# Altium PCB Zotino-DIOT.PCBDOC (part 7 of 11)
Units mil, origin at the board's own origin, x right, y up, seen from the top; angles counter-clockwise.
Board outline 8771.61 x 3949.04 mil, 4 copper layers (TopLayer, Internal Plane 2, Signal Layer 1, BottomLayer), stack 61.54 mil thick; 915 components, 534 nets, 3073 pads, 1180 vias.
Unrouted connection lines stored in the file: 36.
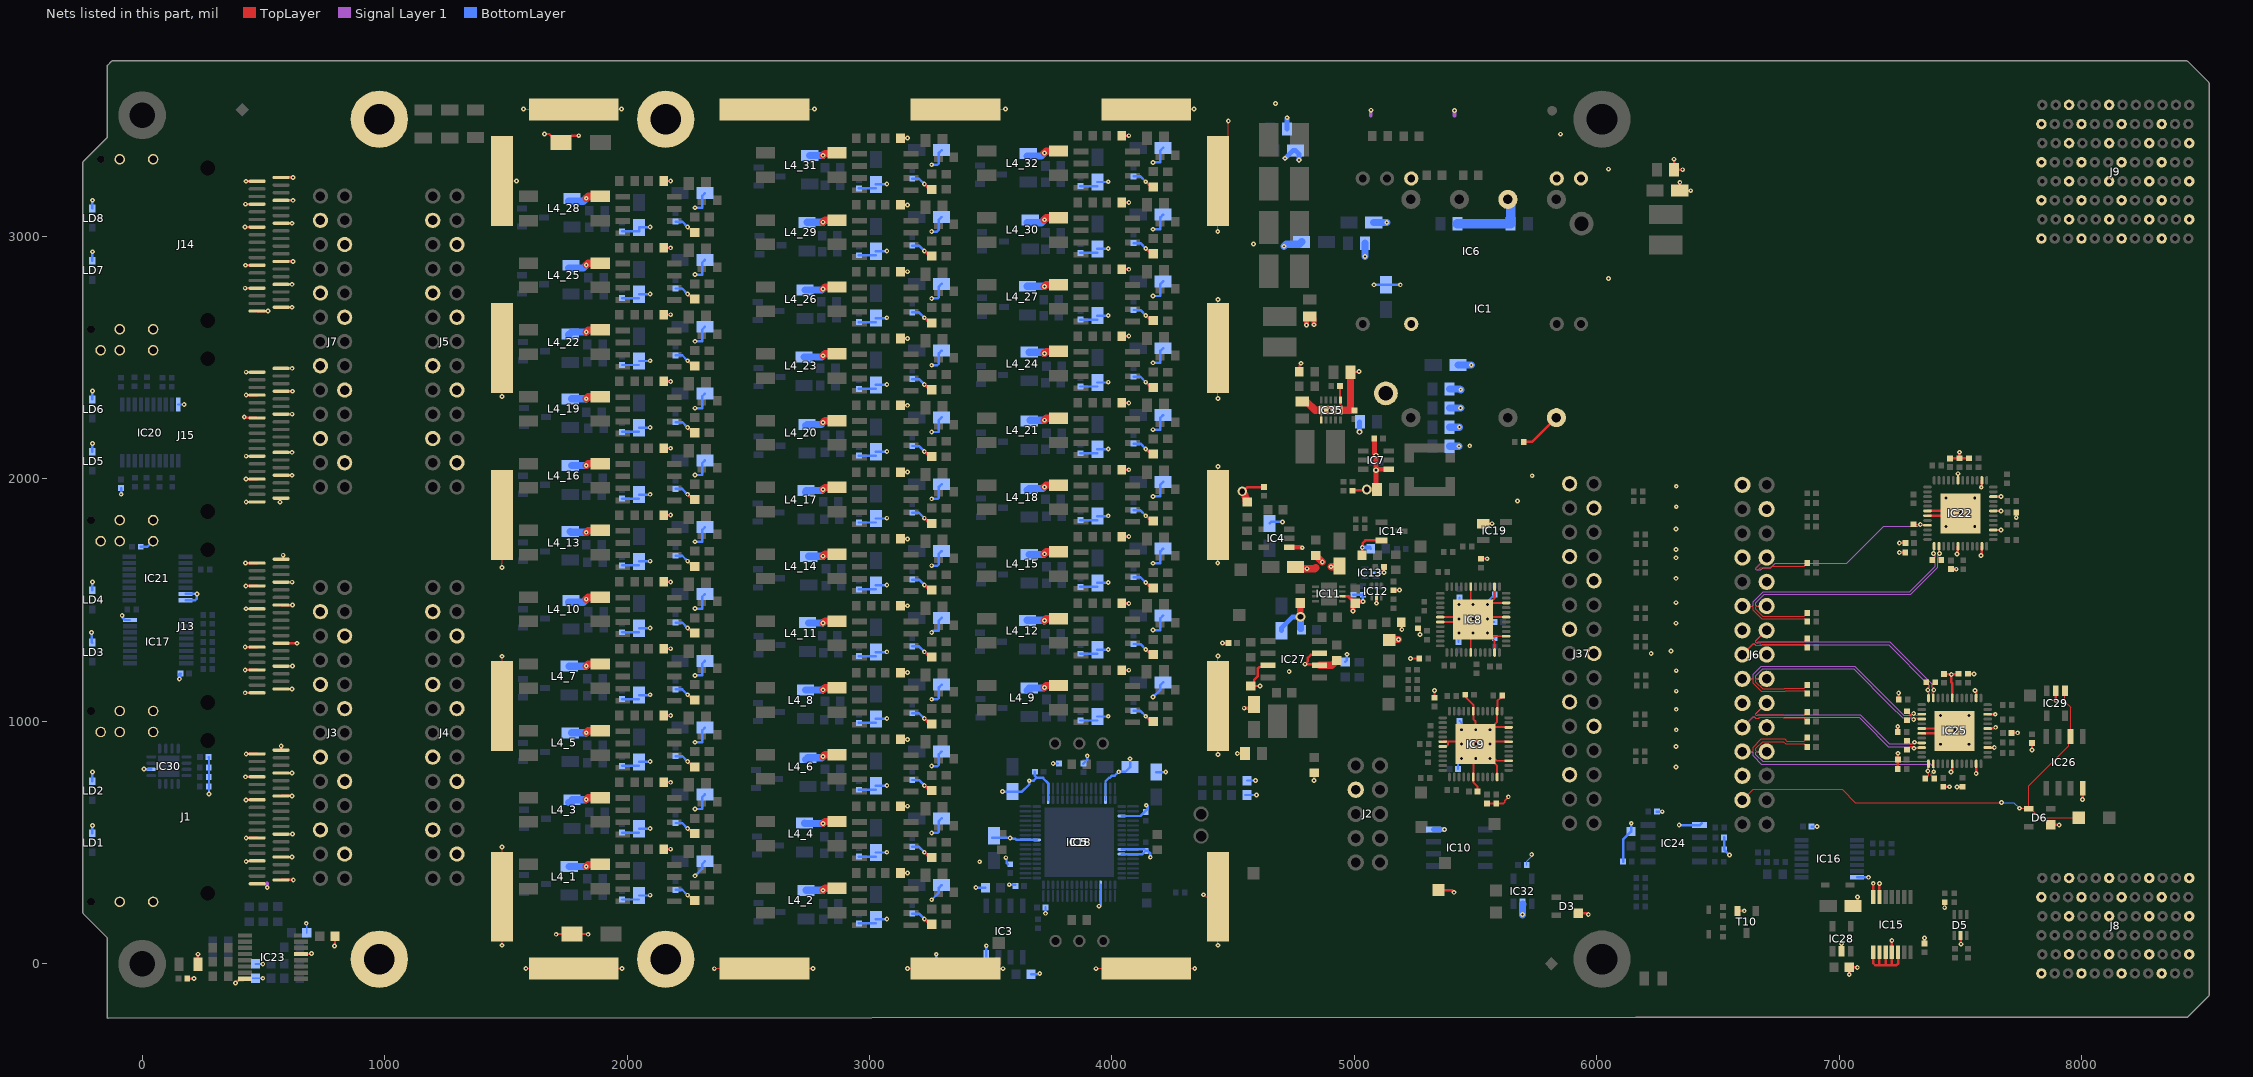
[diagram p8: the nets of this part, all layers, seen from the top]

## Via types
v1: diameter 19.68, hole 7.87, TopLayer to BottomLayer, tented both sides, 1050 vias
v2: diameter 23.62, hole 11.81, TopLayer to BottomLayer, tented both sides, 56 vias
v3: diameter 23.62, hole 11.81, TopLayer to BottomLayer, 28 vias
v4: diameter 39.37, hole 23.62, TopLayer to BottomLayer, tented both sides, 28 vias
v5: diameter 39.37, hole 19.68, TopLayer to BottomLayer, tented both sides, 7 vias
v6: diameter 19.68, hole 7.87, TopLayer to BottomLayer, tented bottom, 7 vias
v7: diameter 19.68, hole 7.87, TopLayer to BottomLayer, 4 vias

## Nets (pads, with @x,y where several pads share a name; then routed paths per layer and width w, separated by ;. In a path a pad name is that pad's centre, name@x,y a point inside that pad or via, vN(x,y) a via of type N, cw(c..) or ccw(c..) an arc to the next point about the centre after c; other vN are vias at no path point) (continued)
EEM1_LVDS2_P: IC22.9 J6.8 R106.1 R138.2 | length 1173.8
  TopLayer w5: J6.8@6700.79,1675.59 6656.75,1631.55 6656.75,1627.41 6659.68,1624.48 6663.82,1624.48 6673.97,1634.63 6717.76,1634.63 6722.49,1639.36 6855.48,1639.36 6858.41,1642.29 6858.41,1644.63 R138.2@6867.32,1653.54 ; R106.1@7307.09,1813.78 7308.38,1812.49 v1(7334.68,1812.49) ; v1@7334.65,1811.56 7335.9,1810.31 7362.92,1810.31 IC22.9@7364.17,1809.06
  Signal Layer 1 w5: J6.8@6700.79,1675.59 6656.75,1631.55 6656.75,1627.41 6659.68,1624.48 6676.19,1624.48 6686.33,1634.63 6717.76,1634.63 6735.96,1652.83 7030.78,1652.83 7183.61,1805.66 7324.41,1805.66 7331.24,1812.49 v1(7334.68,1812.49)
EEM1_LVDS3_N: IC22.14 J6.12 R109.2 R152.2 | length 1280.2
  TopLayer w5: J6.12@6700.79,1475.59 6659.22,1475.59 6656.29,1472.66 6656.29,1462.16 6684.08,1434.37 6856.37,1434.37 6867.8,1445.8 R152.2@6867.8,1446.59 ; IC22.14@7411.42,1722.44 7412.67,1721.19 7412.67,1694.16 7413.92,1692.91 7413.92,1691.9 7407.07,1685.06 7407.07,1675.57 7407.59,1675.06 7411.16,1675.06 7420.08,1666.14 R109.2@7420.08,1665.35
  Signal Layer 1 w5: J6.12@6700.79,1475.59 6659.22,1475.59 6656.29,1478.52 6656.29,1489.02 6690.89,1523.63 7295.09,1523.63 7407.07,1635.61 7407.07,1681.82 7413.92,1688.66 v1(7413.92,1692.09)
EEM1_LVDS3_P: IC22.13 J6.11 R109.1 R139.2 | length 1299.3
  TopLayer w5: J6.11@6600.79,1475.59 6642.36,1475.59 6645.29,1472.66 6645.29,1457.6 6679.52,1423.37 6856.37,1423.37 6867.8,1411.94 R139.2@6867.8,1411.15 ; R109.1@7383.07,1665.35 7383.07,1666.14 7391.99,1675.06 7395.56,1675.06 7396.07,1675.57 7396.07,1685.06 7389.23,1691.9 v1(7389.23,1692.91) 7390.48,1694.16 7390.48,1721.19 IC22.13@7391.73,1722.44
  Signal Layer 1 w5: J6.11@6600.79,1475.59 6642.36,1475.59 6645.29,1478.52 6645.29,1493.58 6686.33,1534.63 7290.53,1534.63 7396.07,1640.17 7396.07,1682.64 7389.23,1689.48 v1(7389.23,1692.91)
EEM1_LVDS4_N: IC25.48 J6.15 R124.2 R154.2 | length 1258.7
  TopLayer w5: J6.15@6600.79,1275.59 6644.83,1319.63 6648.97,1319.63 6655.12,1313.48 6680.74,1313.48 6685.35,1318.09 6855.95,1318.09 6858.88,1315.16 6858.88,1313.77 R154.2@6867.8,1304.85 ; R124.2@7359.45,1161.42 7359.45,1160.63 7368.37,1151.71 7369.52,1151.71 7372.45,1148.78 7372.45,1140.19 7365.61,1133.35 v1(7365.61,1129.92) 7365.61,1128.52 7372.45,1121.67 7372.45,1112.58 7368.11,1108.24 IC25.48@7368.11,1096.46
  Signal Layer 1 w5: J6.15@6600.79,1275.59 6644.83,1319.63 6648.97,1319.63 6655.12,1313.48 6668.38,1313.48 6671.45,1316.56 7203.5,1316.56 7372.45,1147.6 7372.45,1140.19 7365.61,1133.35 v1(7365.61,1129.92)
EEM1_LVDS4_P: IC25.47 J6.14 R124.1 R140.2 | length 1258.4
  TopLayer w5: J6.14@6700.79,1375.59 6656.75,1331.55 6656.75,1327.41 6659.68,1324.48 6676.19,1324.48 6680.8,1329.09 6855.48,1329.09 6858.41,1332.02 6858.41,1333.6 R140.2@6867.32,1342.52 ; IC25.47@7387.8,1096.46 7387.8,1108.24 7383.45,1112.58 7383.45,1121.67 7390.3,1128.52 v1(7390.3,1129.92) 7390.3,1133.35 7383.45,1140.19 7383.45,1148.78 7386.38,1151.71 7387.54,1151.71 7396.46,1160.63 R124.1@7396.46,1161.42
  Signal Layer 1 w5: J6.14@6700.79,1375.59 6656.75,1331.55 6656.75,1327.41 6659.68,1324.48 6663.82,1324.48 6666.89,1327.56 7208.06,1327.56 7383.45,1152.16 7383.45,1140.19 7390.3,1133.35 v1(7390.3,1129.92)
EEM1_LVDS5_N: IC25.4 J6.18 R127.2 R155.2 | length 1166.7
  TopLayer w5: J6.18@6700.79,1175.59 6659.22,1175.59 6656.29,1172.66 6656.29,1162.16 6683.82,1134.63 6772.85,1134.63 6775.62,1137.39 6855.89,1137.39 6867.32,1148.82 R155.2@6867.32,1149.61 ; R127.2@7279.53,1005.12 7280.31,1005.12 7289.23,1014.04 7289.23,1015.19 7292.16,1018.12 7296.47,1018.12 7307.09,1007.5 v1(7307.09,1007.34) 7308.49,1007.34 7315.33,1014.19 7324.43,1014.19 7328.77,1009.84 IC25.4@7340.55,1009.84
  Signal Layer 1 w5: J6.18@6700.79,1175.59 6659.22,1175.59 6656.29,1178.52 6656.29,1189.02 6683.82,1216.56 7059.04,1216.56 7208.66,1066.93 7261.41,1014.19 7296.82,1014.19 7303.66,1007.34 v1(7307.09,1007.34)
EEM1_LVDS5_P: IC25.3 J6.17 R127.1 R142.2 | length 1201.2
  TopLayer w5: J6.17@6600.79,1175.59 6642.36,1175.59 6645.29,1172.66 6645.29,1157.6 6679.26,1123.63 6777.41,1123.63 6780.17,1126.39 6855.89,1126.39 6867.32,1114.96 R142.2@6867.32,1114.17 ; R127.1@7279.53,1042.13 7280.31,1042.13 7289.23,1033.21 7289.23,1029.63 7289.74,1029.12 7299.23,1029.12 7299.33,1029.22 7304.28,1029.22 v1(7307.09,1032.03) 7308.49,1032.03 7315.33,1025.19 7324.43,1025.19 7328.77,1029.53 IC25.3@7340.55,1029.53
  Signal Layer 1 w5: J6.17@6600.79,1175.59 6642.36,1175.59 6645.29,1178.52 6645.29,1193.58 6679.26,1227.56 7063.59,1227.56 7224.22,1066.93 7265.96,1025.19 7296.82,1025.19 7303.66,1032.03 v1(7307.09,1032.03)
EEM1_LVDS6_N: IC25.10 J6.21 R130.2 R156.2 | length 1150.3
  TopLayer w5: J6.21@6600.79,975.59 6644.83,1019.63 6648.97,1019.63 6655.12,1013.48 6668.38,1013.48 6671.45,1016.56 6766.87,1016.56 6769.24,1014.19 6855.48,1014.19 6858.41,1011.26 6858.41,1008.92 R156.2@6867.32,1000 ; R130.2@7279.53,883.07 7280.31,883.07 7289.23,891.99 7289.23,893.15 7292.16,896.07 7293.23,896.07 7293.73,896.57 7300.75,896.57 v1(7308.12,889.23) 7311.02,889.23 7312.27,890.48 7339.3,890.48 IC25.10@7340.55,891.73
  Signal Layer 1 w5: J6.21@6600.79,975.59 6644.83,1019.63 6648.97,1019.63 6655.12,1013.48 6668.38,1013.48 6671.45,1016.56 7082.06,1016.56 7106.44,992.17 7202.54,896.07 7300.75,896.07 7307.59,889.23 v1(7308.12,889.23)
EEM1_LVDS6_P: IC25.9 J6.20 R130.1 R143.2 | length 1135
  TopLayer w5: J6.20@6700.79,1075.59 6656.75,1031.55 6656.75,1027.41 6659.68,1024.48 6663.82,1024.48 6666.89,1027.56 6771.42,1027.56 6773.79,1025.19 6855.48,1025.19 6858.41,1028.11 6858.41,1030.45 R143.2@6867.32,1039.37 ; R130.1@7279.53,920.08 7280.31,920.08 7289.23,911.16 7289.23,910 7292.16,907.07 7293.23,907.07 7293.73,906.57 7300.75,906.57 7308.09,913.92 v1(7311.02,913.92) 7312.27,912.67 7339.3,912.67 IC25.9@7340.55,911.42
  Signal Layer 1 w5: J6.20@6700.79,1075.59 6656.75,1031.55 6656.75,1027.41 6659.68,1024.48 6663.82,1024.48 6666.89,1027.56 7086.62,1027.56 7118.11,996.06 7207.1,907.07 7300.75,907.07 7307.59,913.92 v1(7311.02,913.92)
EEM1_LVDS7_N: IC25.14 J6.24 R134.2 R158.2 | length 1192
  TopLayer w5: J6.24@6700.79,875.59 6659.22,875.59 6656.29,878.52 6656.29,889.02 6683.82,916.56 6769.9,916.56 6778.57,907.89 6855.48,907.89 6858.41,904.96 6858.41,902.62 R158.2@6867.32,893.7 ; IC25.14@7387.8,824.8 7389.05,823.55 7389.05,796.53 7390.3,795.28 7390.14,795.28 v1@7388.64,793.78 ; v1(7390.12,792.3) 7388.33,792.3 7379.52,783.48 7379.52,776.41 7382.44,773.48 7383.6,773.48 7392.52,764.57 R134.2@7392.52,763.78
  Signal Layer 1 w5: J6.24@6700.79,875.59 6659.22,875.59 6656.29,872.66 6656.29,862.16 6683.82,834.63 7001.98,834.63 7365.98,834.65 7390.12,810.51 v1(7390.12,792.3)
EEM1_LVDS7_P: IC25.13 J6.23 R134.1 R145.2 | length 1201.7
  TopLayer w5: J6.23@6600.79,875.59 6642.36,875.59 6645.29,878.52 6645.29,893.58 6679.26,927.56 6774.46,927.56 6783.13,918.89 6855.48,918.89 6858.41,921.81 6858.41,924.15 R145.2@6867.32,933.07 ; R134.1@7355.51,763.78 7355.51,764.57 7364.43,773.48 7365.59,773.48 7368.52,776.41 7368.52,785 7368.42,785.1 7368.42,792.47 v1(7365.61,795.28) 7366.86,796.53 7366.86,823.55 IC25.13@7368.11,824.8
  Signal Layer 1 w5: J6.23@6600.79,875.59 6642.36,875.59 6645.29,872.66 6645.29,857.6 6679.26,823.63 7006.54,823.63 7361.42,823.65 7369.95,815.12 7367.45,812.62 7367.45,797.12 v1(7365.61,795.28)
GND: C1.1 C2.1 C3.1 C4.1 C5.1 C7.2 C8.1 C9.1 C10.2 C11.1 C12.2 C13.1 C14.2 C15.2 C17.1 C18.1 C19.1 C20.1 C21.1 C22.1 C23.1 C24.1 C25.1 C26.1 C28.1 C29.1 C30.1 C31.1 C32.1 C33.1 C34.1 C35.1 C36.1 C37.1 C38.1 C39.1 C40.2 C41.1 C42.1 C43.1 C44.1 C45.1 C46.1 C47.2 C48.1 C49.1 C50.1 C51.1 C52.1 C53.1 C54.1 C55.1 C57.1 C58.1 C59.1 C60.1 C61_1.1 C61_2.1 C61_3.1 C61_4.1 C61_5.1 C61_6.1 C61_7.1 C61_8.1 C61_9.1 C61_10.1 C61_11.1 C61_12.1 C61_13.1 C61_14.1 C61_15.1 C61_16.1 C61_17.1 C61_18.1 C61_19.1 C61_20.1 C61_21.1 C61_22.1 C61_23.1 C61_24.1 C61_25.1 C61_26.1 C61_27.1 C61_28.1 C61_29.1 C61_30.1 C61_31.1 C61_32.1 C62_1.1 C62_2.1 C62_3.1 C62_4.1 C62_5.1 C62_6.1 C62_7.1 C62_8.1 C62_9.1 C62_10.1 C62_11.1 C62_12.1 C62_13.1 C62_14.1 C62_15.1 C62_16.1 C62_17.1 C62_18.1 C62_19.1 C62_20.1 C62_21.1 C62_22.1 C62_23.1 C62_24.1 C62_25.1 C62_26.1 C62_27.1 C62_28.1 C62_29.1 C62_30.1 C62_31.1 C62_32.1 C63.1 C68.1 C69.1 C70.1 C71.1 C76.1 C77.1 C78.1 C79.2 C80.1 C81.1 C82.1 C83.1 C90_1.2 C90_2.2 C90_3.2 C90_4.2 C90_5.2 C90_6.2 C90_7.2 C90_8.2 C90_9.2 C90_10.2 C90_11.2 C90_12.2 C90_13.2 C90_14.2 C90_15.2 C90_16.2 C90_17.2 C90_18.2 C90_19.2 C90_20.2 C90_21.2 C90_22.2 C90_23.2 C90_24.2 C90_25.2 C90_26.2 C90_27.2 C90_28.2 C90_29.2 C90_30.2 C90_31.2 C90_32.2 C91_1.1 C91_2.1 C91_3.1 C91_4.1 C91_5.1 C91_6.1 C91_7.1 C91_8.1 C91_9.1 C91_10.1 C91_11.1 C91_12.1 C91_13.1 C91_14.1 C91_15.1 C91_16.1 C91_17.1 C91_18.1 C91_19.1 C91_20.1 C91_21.1 C91_22.1 C91_23.1 C91_24.1 C91_25.1 C91_26.1 C91_27.1 C91_28.1 C91_29.1 C91_30.1 C91_31.1 C91_32.1 C92_1.1 C92_2.1 C92_3.1 C92_4.1 C92_5.1 C92_6.1 C92_7.1 C92_8.1 C92_9.1 C92_10.1 C92_11.1 C92_12.1 C92_13.1 C92_14.1 C92_15.1 C92_16.1 C92_17.1 C92_18.1 C92_19.1 C92_20.1 C92_21.1 C92_22.1 C92_23.1 C92_24.1 C92_25.1 C92_26.1 C92_27.1 C92_28.1 C92_29.1 C92_30.1 C92_31.1 C92_32.1 C93_1.1 C93_2.1 C93_3.1 C93_4.1 C93_5.1 C93_6.1 C93_7.1 C93_8.1 C93_9.1 C93_10.1 C93_11.1 C93_12.1 C93_13.1 C93_14.1 C93_15.1 C93_16.1 C93_17.1 C93_18.1 C93_19.1 C93_20.1 C93_21.1 C93_22.1 C93_23.1 C93_24.1 C93_25.1 C93_26.1 C93_27.1 C93_28.1 C93_29.1 C93_30.1 C93_31.1 C93_32.1 C95.1 C96.1 C100.1 C103.1 C108.1 C109.2 C124.2 C129.1 C130.1 C131.1 C132.2 C133.1 C134.2 C136.2 C137.1 C138.1 C139.1 C140.1 C141.1 C142.1 C144.1 C147.1 C148.1 C149.1 C150.1 C151.1 CLIP28.1 CLIP29.1 CLIP30.1 CLIP31.1 CLIP32.1 CLIP33.1 CLIP34.1 CLIP37.1 CLIP38.1 CLIP39.1 CLIP40.1 CLIP41.1 CLIP42.1 CLIP43.1 CLIP44.1 CLIP45.1 CLIP46.1 CLIP47.1 D1.2 D2.1 D3.1 D5.2 D6.1 IC1.3 IC1.5 IC1.8 IC3.4 IC4.1 IC5.4 IC5.25 IC5.34 IC5.46 IC5.51 IC5.58 IC5.59 IC6.2 IC6.3 IC6.9 IC6.16 IC7.1 IC8.6 IC8.7 IC8.18 IC8.23 IC8.27 IC8.31 IC8.34 IC8.38 IC8.43 IC8.49 IC9.6 IC9.7 IC9.18 IC9.23 IC9.27 IC9.31 IC9.34 IC9.38 IC9.43 IC9.49 IC10.4 IC11.6 IC12.2 IC13.2 IC14.2 IC15.6 IC15.7 IC15.8 IC15.9 IC15.10 IC15.11 IC15.12 IC16.7 IC17.8 IC18.4 IC18.25 IC18.34 IC18.46 IC18.51 IC18.58 IC18.59 IC19.1 IC20.10 IC21.7 IC21.8 IC22.6 IC22.7 IC22.18 IC22.23 IC22.27 IC22.31 IC22.34 IC22.38 IC22.43 IC22.49 IC23.8 IC23.13 IC24.1 IC25.6 IC25.7 IC25.18 IC25.23 IC25.27 IC25.31 IC25.34 IC25.38 IC25.43 IC25.49 IC26.4 IC27.3 IC27.6 IC27.7 IC28.2 IC29.2 IC30.6 IC32.2 IC35.1 IC35.6 IC35.11 J1.A1 J1.A4 J1.A7 J1.A12 J1.A15 J1.A18 J1.B1 J1.B4 J1.B7 J1.B12 J1.B15 J1.B18 J1.SHELL1 J1.SHELL2 J1.SHELL3 J1.SHELL4 J1.SHELL5 J2.3 J3.3 J3.6 J3.9 J3.12 J3.15 J3.18 J3.21 J3.24 J4.3 J4.6 J4.9 J4.12 J4.15 J4.18 J4.21 J4.24 J5.3 J5.6 J5.9 J5.12 J5.15 J5.18 J5.21 J5.24 J6.1 J6.4 J6.7 J6.10 J6.13 J6.16 J6.19 J6.22 J6.25 J7.3 J7.6 J7.9 J7.12 J7.15 J7.18 J7.21 J7.24 J8.A2 J8.A4 J8.A6 J8.C1 J8.C5 J8.D2 J8.D4 J8.D6 J8.F1 J8.F5 J8.G2 J8.G4 J8.G6 J8.I1 J8.I5 J8.J2 J8.J4 J8.J6 J8.L1 J8.L5 J9.A2 J9.A4 J9.A6 J9.C1 J9.C3 J9.C5 J9.C7 J9.D2 J9.D4 J9.D6 J9.F1 J9.F3 J9.F5 J9.F7 J9.G2 J9.G4 J9.G6 J9.G8 J9.I1 J9.I3 J9.I5 J9.I7 J9.J2 J9.J4 J9.J6 J9.J8 J9.L1 J9.L3 J9.L5 J9.L7 J13.A1 J13.A4 J13.A7 J13.A12 J13.A15 J13.A18 J13.B1 J13.B4 J13.B7 J13.B12 J13.B15 J13.B18 J13.SHELL1 J13.SHELL2 J13.SHELL3 J13.SHELL4 J13.SHELL5 J14.A1 J14.A4 J14.A7 J14.A12 J14.A15 J14.A18 J14.B1 J14.B4 J14.B7 J14.B12 J14.B15 J14.B18 J14.SHELL1 J14.SHELL2 J14.SHELL4 J14.SHELL5 J15.A1 J15.A4 J15.A7 J15.A12 J15.A15 J15.A18 J15.B1 J15.B4 J15.B7 J15.B12 J15.B15 J15.B18 J15.SHELL1 J15.SHELL2 J15.SHELL3 J15.SHELL4 J15.SHELL5 J37.1 J37.4 J37.7 J37.10 J37.13 J37.16 J37.19 J37.22 J37.25 L4_1.2 L4_2.2 L4_3.2 L4_4.2 L4_5.2 L4_6.2 L4_7.2 L4_8.2 L4_9.2 L4_10.2 L4_11.2 L4_12.2 L4_13.2 L4_14.2 L4_15.2 L4_16.2 L4_17.2 L4_18.2 L4_19.2 L4_20.2 L4_21.2 L4_22.2 L4_23.2 L4_24.2 L4_25.2 L4_26.2 L4_27.2 L4_28.2 L4_29.2 L4_30.2 L4_31.2 L4_32.2 LD1.1 LD2.1 LD3.1 LD4.1 LD5.1 LD6.1 LD7.1 LD8.1 pad.0@2159.21,19.21 pad.1 pad.2 pad.3 R2.1 R15.1 R16.1 R17.1 R19.1 R20.1 R21.1 R23.1 R34.1 R40.1 R44.1 R68_1.1 R68_2.1 R68_3.1 R68_4.1 R68_5.1 R68_6.1 R68_7.1 R68_8.1 R68_9.1 R68_10.1 R68_11.1 R68_12.1 R68_13.1 R68_14.1 R68_15.1 R68_16.1 R68_17.1 R68_18.1 R68_19.1 R68_20.1 R68_21.1 R68_22.1 R68_23.1 R68_24.1 R68_25.1 R68_26.1 R68_27.1 R68_28.1 R68_29.1 R68_30.1 R68_31.1 R68_32.1 R70.1 R73.2 R74.2 R96.1 R102.1 R108.1 R111.2 R112.1 R126.1 R129.1 R132.2 R133.1 R153.1 R157.2 R159.1 R161.1 R164.1 R165.1 R171.2 R229.1 R298.1 T10.2 TP6.1 TP7.1 | length 36328.9
  TopLayer w5: CLIP38.1@1473.44,3218.04 CLIP38.1@1484.51,3229.11 v1(1543.63,3229.11) ; v1(1484.02,481.82) 1484.51,481.33 CLIP46.1@1484.51,276.36 1484.51,85.28 v1(1484.51,76.47) ; v1(1484,1634.52) 1484,1651.45 1484.51,1651.96 CLIP40.1@1484.51,1851.16 ; CLIP47.1@1484.51,1063.76 v1(1484.51,1268.73) ; v1(1484.51,2340.25) 1484.51,2349.06 CLIP39.1@1484.51,2540.14 ; v1(1572.6,3525.67) 1778.5,3525.67 CLIP41.1@1779.78,3524.39 1781.07,3525.67 v1(1977.61,3525.67) ; v1(1582.44,-18.92) CLIP43.1@1779.78,-18.92 1970.86,-18.92 v1(1979.67,-18.92) ; v1(2360,-20.15) 2361.23,-18.92 CLIP44.1@2567.18,-18.92 2758.26,-18.92 v1(2767.07,-18.92) ; CLIP42.1@2567.18,3524.39 2568.47,3525.67 v1(2772.78,3525.67) ; v1(3157.24,-18.92) CLIP32.1@3354.59,-18.92 3549.72,-18.92 v1(3550.94,-20.15) ; CLIP33.1@3354.59,3524.39 3356.11,3525.91 v1(3560.79,3525.91) ; v1(3934.8,-20.15) 3936.03,-18.92 CLIP45.1@4141.99,-18.92 4333.06,-18.92 v1(4341.87,-18.92) ; CLIP34.1@4141.99,3524.39 4143.27,3525.67 v1(4338.24,3525.67) ; v1(4378.21,284.97) 4386.82,276.36 CLIP37.1@4437.27,276.36 4437.27,85.28 v1(4437.27,76.47) ; v1(4436.77,1653.08) 4437.27,1653.57 CLIP29.1@4437.27,1851.16 4437.27,2042.23 v1(4437.27,2051.04) ; v1(4436.77,3021.19) 4437.27,3021.68 CLIP31.1@4437.27,3229.11 4480.04,3271.89 4480.04,3476.1 v1(4480.32,3476.38) ; v1(4437.27,863.87) 4437.27,872.68 CLIP28.1@4437.27,1063.76 v1(4437.27,1269.22) ; v1(4437.27,2332.21) CLIP30.1@4437.27,2540.14 4437.27,2731.21 v1(4437.27,2740.02)
  TopLayer w8: v1(385.22,-79.16) 385.22,-77.85 393.71,-69.36 416.35,-69.36 IC23.8@423.49,-62.23 ; IC23.13@655.77,40.13 696.08,40.13 v1(698.84,42.89) ; v1(793.84,72.89) 795.34,74.39 C96.1@795.34,112.89 ; v1(4517.48,867.65) C8.1@4548.98,867.65 ; R164.1@4772.89,2441.71 4772.89,2469.93 v1(4780.28,2477.31) ; IC35.6@4863.44,2242.89 4863.44,2277.49 IC35.11@4863.84,2277.89 ; IC35.11@4938.84,2282.89 4942.18,2286.23 IC35.1@4942.18,2325.57 ; C150.1@4940.22,2382.65 4940.22,2336.51 IC35.1@4943.84,2332.89 ; C151.1@4977.62,2427.89 4977.62,2441.71 5017.66,2441.71 v1(5018.84,2442.89) ; v1(5231.8,1258.8) R19.1@5266.96,1258.8 ; R17.1@5262.73,1383.26 5263.52,1383.26 5270.94,1375.84 5270.94,1358.29 v1(5271.18,1358.04) ; v1(5330.15,1127.89) 5331.15,1126.89 R20.1@5331.15,1098.39 ; IC8.7@5354.32,1410.18 5424.44,1410.18 5434.28,1420.02 IC8.49@5490.15,1420.02 ; IC8.6@5354.32,1429.87 IC8.49@5431.09,1429.87 ; IC9.7@5364.72,896.53 5381.31,896.53 5381.31,898.69 5387,904.39 5387,916.21 ; IC9.6@5364.72,916.21 5387,916.21 ; R21.1@5456.64,1109.89 5456.64,1102.39 5490.71,1068.33 IC9.43@5490.71,1042.2 5490.71,1009.33 5500.55,999.49 v3(5500.55,965.43) v3(5500.55,906.37) ; IC8.18@5480.31,1284.2 5480.31,1346.05 5490.15,1355.89 v3(5490.15,1363.83) IC8.49@5490.15,1418.89 ; IC8.43@5480.31,1555.85 5480.31,1504.73 5490.15,1494.89 v3(5490.15,1481.94) v3(5490.15,1422.89) ; IC8.49@5500.28,1420.02 5542.28,1420.02 IC8.49@5547.18,1424.92 ; IC9.49@5500.55,909.29 5589.13,997.87 IC9.38@5589.13,1042.2 5590.31,1043.37 5590.31,1084.69 5601.34,1095.73 5609.65,1095.73 R171.2@5609.65,1105.89 ; C24.1@5508.27,710.37 5508.27,731.05 5490.71,748.61 IC9.18@5490.71,770.54 5490.71,833.45 5500.55,843.29 v3(5500.55,847.32) v3(5500.55,906.37) ; R16.1@5522.46,1671.3 5547.7,1671.3 v1(5548,1671) ; IC19.1@5531.27,1814.91 5531.99,1815.64 v1(5568.14,1815.64) ; IC8.49@5547.2,1361.83 5578.73,1330.31 IC8.23@5578.73,1284.2 ; R23.1@5547.46,661.29 R157.2@5585.46,661.29 5614.55,661.29 5620.37,667.12 5620.37,672.77 5635.15,687.55 v1(5635.15,688.89) ; IC8.49@5547.77,1362.4 IC8.49@5490.15,1420.02 ; IC8.49@5552.12,1429.87 IC8.31@5625.97,1429.87 ; IC9.49@5558.62,907.36 5557.63,906.37 IC9.49@5517.67,906.37 ; IC8.49@5559.05,1351.13 IC8.27@5625.97,1351.13 ; IC9.49@5567.47,916.21 IC9.31@5636.38,916.21 ; IC9.49@5570.15,975.97 5635.68,975.97 IC9.34@5636.38,975.27 ; 5573.15,1503.02 IC8.49@5490.15,1420.02 ; IC9.49@5577.03,829.89 5589.13,817.79 IC9.23@5589.13,770.54 ; IC8.38@5578.73,1555.85 5578.73,1508.61 5559.05,1488.92 IC8.34@5625.97,1488.92 ; IC9.27@5636.38,837.47 5586.56,837.47 IC9.49@5517.67,906.37 ; 5387,916.21 5426.79,916.21 5436.63,906.37 v3(5441.49,906.37) v3(5500.55,906.37) ; v3(5500.55,906.37) IC9.49@5517.67,906.37
  TopLayer w10: C40.2@186.02,-61.02 v1(213.58,-61.02) ; R73.2@229.74,-2.08 v1(229.74,39.78) ; v1(421.07,2255.37) 423.69,2255.37 426.83,2252.23 473.45,2252.23 J15.A12@474.17,2251.5 ; v1(423.69,3038.91) J14.A12@474.17,3038.91 ; v1(424.68,1306.62) J13.A7@474.17,1306.62 ; v1(424.68,2786.94) J14.A4@474.17,2786.94 ; v1(424.73,1117.65) J13.A1@474.17,1117.65 ; v1(424.73,1212.13) J13.A4@474.17,1212.13 ; v1(425.66,771.19) J1.A15@474.17,771.19 ; v1(425.72,2881.43) J14.A7@474.17,2881.43 ; v1(426.7,1653.08) J13.A18@474.17,1653.08 ; v1(426.7,3133.39) J14.A15@474.17,3133.39 ; v1@427.17,1906.78 v1(428.9,1905.05) J15.A1@474.17,1905.05 ; v1(427.63,1558.59) J13.A15@474.17,1558.59 ; v1(427.68,675.92) 428.08,676.31 473.78,676.31 J1.A12@474.17,676.7 ; v1(427.69,1999.54) J15.A4@474.17,1999.54 ; v1(427.69,3227.88) J14.A18@474.17,3227.88 ; v1(428.53,1464.47) 428.72,1464.28 473.99,1464.28 J13.A12@474.17,1464.1 ; v1(428.9,421.95) 431.52,421.95 433.58,424.01 473.45,424.01 J1.A4@474.17,424.73 ; v1@428.9,2094.25 v1(428.9,2094.02) J15.A7@474.17,2094.02 ; v1@428.9,2345.71 v1(428.9,2345.99) J15.A15@474.17,2345.99 ; v1@428.9,2440.2 v1(428.9,2440.48) J15.A18@474.17,2440.48 ; v1@429.42,518.7 v1(428.9,519.22) J1.A7@474.17,519.22 ; v1@431.33,868.11 v1(428.9,865.68) J1.A18@474.17,865.68 ; J1.A1@474.17,330.24 501.69,330.24 515.81,316.13 v1(515.81,314.78) ; J14.A1@474.17,2692.45 v1(519.45,2692.45) v1@519.45,2689.83 ; v1(568.9,1904.06) 568.9,1919.05 570.64,1920.8 J15.B1@572.99,1920.8 ; J1.B1@572.99,345.99 v1(623.55,345.99) ; J1.B4@572.99,440.48 v1(618.27,440.48) v1@617.75,439.96 ; J1.B7@572.99,534.97 v1(619.61,534.97) ; J1.B12@572.99,692.45 v1(618.27,692.45) v1@618.27,693.74 ; J1.B15@572.99,786.94 v1(618.27,786.94) v1@617.8,787.4 ; J1.B18@572.99,881.42 573.35,881.79 v1(573.35,898.16) v1@574.75,896.76 ; J13.B1@572.99,1133.39 v1(618.27,1133.39) v1@619.09,1134.22 ; J13.B4@572.99,1227.88 v1(619.56,1227.88) ; J13.B7@572.99,1322.37 v1(638.26,1322.37) ; J13.B12@572.99,1479.85 v1(619.56,1479.85) ; J13.B15@572.99,1574.34 v1(618.58,1574.34) ; J13.B18@572.99,1668.83 579.95,1668.83 581.69,1670.57 v1(581.69,1685.56) ; J15.B4@572.99,2015.28 v1(618.27,2015.28) v1@617.8,2015.75 ; J15.B7@572.99,2109.77 v1(618.27,2109.77) v1@618.27,2111.06 ; J15.B12@572.99,2267.25 v1(618.63,2267.25) ; J15.B15@572.99,2361.74 v1(620.54,2361.74) ; J15.B18@572.99,2456.23 v1(618.57,2456.23) ; J14.B1@572.99,2708.2 v1(618.27,2708.2) v1@617.75,2707.68 ; J14.B4@572.99,2802.68 v1(618.27,2802.68) v1@619.09,2801.86 ; J14.B7@572.99,2897.17 v1(622.51,2897.17) ; J14.B12@572.99,3054.65 v1(618.27,3054.65) v1@616.76,3053.15 ; J14.B15@572.99,3149.14 v1(622.51,3149.14) ; J14.B18@572.99,3243.63 v1(622.51,3243.63) ; v6(1659.21,3422.8) 1678.86,3422.8 1714.14,3387.52 D1.2@1728.11,3387.52 1743.01,3387.52 1771.4,3415.91 v6(1800.94,3415.91) ; v6(1707.56,121.54) 1708.99,122.96 D2.1@1773.35,122.96 1838.29,122.96 v6(1839.71,121.54) ; R68_1.1@2151.5,473 v1(2180,473) ; R68_3.1@2151.5,748.59 v1(2180,748.59) ; R68_5.1@2151.5,1024.18 v1(2180,1024.18) ; R68_7.1@2151.5,1299.77 v1(2180,1299.77) ; R68_10.1@2151.49,1575.36 v1(2180,1575.36) ; R68_13.1@2151.49,1850.95 v1(2180,1850.95) ; R68_16.1@2151.49,2126.54 v1(2180,2126.54) ; R68_19.1@2151.5,2402.13 v1(2180,2402.13) ; R68_22.1@2151.5,2677.72 v1(2180,2677.72) ; R68_25.1@2151.49,2953.32 v1(2180,2953.32) ; R68_28.1@2151.5,3228.91 v1(2180,3228.91) ; v1(2250,283) 2271.5,261.5 C61_1.1@2280,261.5 ; v1(2250,558.59) 2271.5,537.1 C61_3.1@2280,537.09 ; v1(2250,834.18) 2271.5,812.69 C61_5.1@2280,812.69 ; v1(2250,1109.77) 2271.5,1088.28 C61_7.1@2280,1088.28 ; v1(2250,1385.36) 2271.5,1363.87 C61_10.1@2280,1363.87 ; v1(2250,1660.95) 2271.5,1639.46 C61_13.1@2280,1639.46 ; v1(2250,1936.54) 2271.5,1915.05 C61_16.1@2280,1915.05 ; v1(2250,2212.13) 2271.5,2190.64 C61_19.1@2280,2190.64 ; v1(2250,2487.72) 2271.5,2466.23 C61_22.1@2280,2466.23 ; v1(2250,2763.32) 2271.5,2741.82 C61_25.1@2280,2741.82 ; v1(2250,3038.91) 2271.5,3017.41 C61_28.1@2280,3017.41 ; R68_2.1@3127.87,374.57 v1(3156.38,374.57) ; R68_4.1@3127.87,650.17 v1(3156.38,650.17) ; R68_6.1@3127.87,925.76 v1(3156.38,925.76) ; R68_8.1@3127.87,1201.35 v1(3156.38,1201.35) ; R68_11.1@3127.87,1476.94 v1(3156.38,1476.94) ; R68_14.1@3127.87,1752.53 v1(3156.38,1752.53) ; R68_17.1@3127.87,2028.12 v1(3156.38,2028.12) ; R68_20.1@3127.87,2303.71 v1(3156.38,2303.71) ; R68_23.1@3127.87,2579.3 v1(3156.38,2579.3) ; R68_26.1@3127.87,2854.89 v1(3156.38,2854.89) ; R68_29.1@3127.87,3130.48 v1(3156.38,3130.48) ; R68_31.1@3127.87,3406.07 v1(3156.38,3406.07) ; v1(3226.38,184.57) 3247.87,163.08 C61_2.1@3256.38,163.08 ; v1(3226.38,460.17) 3247.87,438.67 C61_4.1@3256.38,438.67 ; v1(3226.38,735.76) 3247.87,714.26 C61_6.1@3256.38,714.26 ; v1(3226.38,1011.35) 3247.87,989.85 C61_8.1@3256.38,989.85 ; v1(3226.38,1286.94) 3247.87,1265.44 C61_11.1@3256.38,1265.44 ; v1(3226.38,1562.53) 3247.87,1541.03 C61_14.1@3256.38,1541.03 ; v1(3226.38,1838.12) 3247.87,1816.62 C61_17.1@3256.38,1816.62 ; v1(3226.38,2113.71) 3247.87,2092.21 C61_20.1@3256.38,2092.21 ; v1(3226.38,2389.3) 3247.87,2367.8 C61_23.1@3256.38,2367.8 ; v1(3226.38,2664.89) 3247.87,2643.39 C61_26.1@3256.38,2643.39 ; v1(3226.38,2940.48) 3247.87,2918.99 C61_29.1@3256.38,2918.98 ; v1(3226.38,3216.07) 3247.87,3194.58 C61_31.1@3256.38,3194.57 ; v1@3559.72,440.48 v1(3562.41,437.79) ; R68_9.1@4041.26,1211.19 v1(4069.76,1211.19) ; R68_12.1@4041.26,1486.78 v1(4069.76,1486.78) ; R68_15.1@4041.26,1762.37 v1(4069.76,1762.37) ; R68_18.1@4041.26,2037.96 v1(4069.76,2037.96) ; R68_21.1@4041.26,2313.55 v1(4069.76,2313.55) ; R68_24.1@4041.26,2589.14 v1(4069.76,2589.14) ; R68_27.1@4041.26,2864.73 v1(4069.76,2864.73) ; R68_30.1@4041.26,3140.32 v1(4069.76,3140.32) ; R68_32.1@4041.26,3415.91 v1(4069.76,3415.91) ; v1(4139.76,1021.19) 4161.26,999.69 C61_9.1@4169.76,999.69 ; v1(4139.76,1296.78) 4161.26,1275.28 C61_12.1@4169.76,1275.28 ; v1(4139.76,1572.37) 4161.26,1550.87 C61_15.1@4169.76,1550.87 ; v1(4139.76,1847.96) 4161.26,1826.47 C61_18.1@4169.76,1826.46 ; v1(4139.76,2123.55) 4161.26,2102.06 C61_21.1@4169.76,2102.06 ; v1(4139.76,2399.14) 4161.26,2377.65 C61_24.1@4169.76,2377.64 ; v1(4139.76,2674.73) 4161.26,2653.24 C61_27.1@4169.76,2653.23 ; v1(4139.76,2950.32) 4161.26,2928.83 C61_30.1@4169.76,2928.83 ; v1(4139.76,3225.91) 4161.26,3204.42 C61_32.1@4169.76,3204.42 ; v1(4455.81,1322.8) C33.1@4481.41,1322.8 ; v4@4548.98,1956.23 4558.82,1966.07 C5.1@4627.72,1966.07 ; R153.1@4572.45,1145.87 v1(4611.23,1145.91) v1(4611.23,1145.91) ; R153.1@4586.23,1145.91 4586.23,1171.1 4602.36,1187.23 4602.36,1218.44 4608.22,1224.3 4636.51,1224.3 IC27.3@4643.32,1231.11 ; v1(4833.97,756.55) R15.1@4833.97,788.05 ; IC27.6@4851.23,1235.91 v1(4796.23,1235.91) 4807.82,1247.51 4807.82,1261.72 4820.4,1274.3 4849.1,1274.3 IC27.7@4855.92,1281.11 ; R34.1@4993.46,1953.18 v4@5047.39,1953.18 ; C32.1@5032.12,1685.7 5032.89,1686.48 v1(5032.89,1717.11) 5034.74,1718.96 5034.74,1735.48 5045.55,1746.29 IC14.2@5112.45,1746.29 ; v1@5091.24,1487.37 IC12.2@5091.24,1513.64 ; C34.1@5121.7,1636.93 5121.92,1636.71 5121.92,1613.89 v1(5122.13,1613.67) ; C30.1@5161.59,1541.02 5162.01,1541.44 5185.49,1541.44 v1(5185.91,1541.87) ; R44.1@5194.22,1409.61 5195.96,1407.88 v1(5195.96,1379.24) ; TP6.1@5347.9,303.75 5402.24,303.75 v1(5411.18,294.81) ; R2.1@5698.5,2153 5733.54,2153 IC1.3@5833.54,2253 ; D3.1@5924.28,207.85 5957.73,207.85 5962.69,202.89 v1(5965.31,202.89) ; v1(6318.9,3318.9) C44.1@6318.9,3275.59 v1(6354.33,3275.59) ; v1@6341.54,3224.41 v1(6342.52,3223.43) C15.2@6342.52,3188.98 v1(6387.8,3188.98) v1@6387.8,3190.94 ; T10.2@6580.71,218.5 v1(6608.27,218.5) ; IC28.2@7009.92,51.54 v1(7009.92,83.04) v1@7010.54,83.66 ; v1@7043.31,-44.29 v1(7041.34,-44.29) C108.1@7041.34,-14.76 v1(7074.8,-14.76) ; C109.2@7057.38,239 7075.79,257.41 v1(7075.79,275.59) ; IC15.8@7140.34,47.36 7140.34,2.37 7148.62,-5.91 7170.28,-5.91 ; IC15.7@7140.34,275.71 v1(7140.34,332.1) ; IC15.9@7165.93,47.36 7165.93,-1.56 7170.28,-5.91 ; IC15.6@7165.93,275.71 v1(7165.93,331.29) ; IC15.10@7191.53,47.36 7191.53,-5.5 7191.93,-5.91 ; v1(7217.12,95.88) IC15.11@7217.12,47.36 7217.12,-5.5 7217.52,-5.91 ; R133.1@7241.34,803.15 7241.73,803.54 7241.73,842.13 C55.1@7242.13,842.52 ; R129.1@7241.34,956.69 v1(7241.34,978.74) v1@7242.91,980.31 ; C55.1@7242.13,842.52 v1(7242.12,868.54) ; IC15.12@7242.71,47.36 7242.71,0.58 7236.22,-5.91 7217.52,-5.91 ; R112.1@7245.28,1090.55 v1(7245.28,1116.93) ; v1(7248.03,1696.85) R108.1@7272.83,1696.85 ; v1(7248.03,1736.22) C49.1@7273.62,1736.22 ; IC25.7@7340.55,950.79 7466.54,950.79 IC25.49@7476.38,960.63 7466.54,970.47 IC25.6@7340.55,970.47 ; C39.1@7351.39,83.05 v1(7351.39,106.28) ; IC22.7@7364.17,1848.43 7490.16,1848.43 IC22.49@7500,1858.27 7490.16,1868.11 IC22.6@7364.17,1868.11 ; C57.1@7429.13,730.31 7429.21,730.24 7454.4,730.24 v1(7454.48,730.17) ; C58.1@7433.07,1194.88 7433.58,1194.37 7461.95,1194.37 v1(7462.46,1193.87) ; R298.1@7435.37,253.18 7435.15,252.96 7435.15,231.7 v1(7434.93,231.48) v1@7436.21,231.48 ; C52.1@7456.69,2084.65 7457.09,2085.04 7535.04,2085.04 R96.1@7535.43,2085.43 ; v1(7460.63,791.34) 7466.54,797.24 IC25.18@7466.54,824.8 ; C51.1@7460.63,1627.95 v1(7482.68,1627.95) v1@7484.25,1626.38 ; IC25.43@7466.54,1096.46 7466.54,1157.48 7462.46,1161.56 v1(7462.46,1193.87) ; v1(7485.43,729.53) R132.2@7507.87,729.53 ; v1(7485.52,1690.17) 7485.52,1692.79 7489.81,1697.08 7489.81,1722.09 IC22.18@7490.16,1722.44 ; IC22.43@7490.16,1994.09 v1(7490.16,2021.65) ; R126.1@7492.13,1195.67 7491.22,1194.77 7463.36,1194.77 v1(7462.46,1193.87) ; R102.1@7496.06,2085.43 v1(7496.06,2110.24) ; D5.2@7500.35,116.46 7501.4,115.41 7501.4,82.04 v1(7502.45,80.99) ; R111.2@7531.5,1195.67 v1(7556.3,1195.67) ; v1(7560.44,1127.05) 7560.44,1124.43 7564.61,1120.25 7564.61,1096.8 IC25.38@7564.96,1096.46 ; v1(7564.96,785.43) IC25.23@7564.96,824.8 ; v1@7583.5,1677.98 7583.5,1682.51 v1(7585.35,1684.36) 7585.35,1686.99 7588.24,1689.87 7588.24,1722.09 IC22.23@7588.58,1722.44 ; v1(7585.93,1965.79) 7585.93,1968.41 7588.24,1970.72 7588.24,1993.75 IC22.38@7588.58,1994.09 ; IC25.27@7612.2,891.73 v1(7639.76,891.73) ; IC25.31@7612.2,970.47 7612.55,970.82 7638.23,970.82 7642.78,975.37 v1(7645.4,975.37) ; IC25.34@7612.2,1029.53 v1(7643.7,1029.53) ; IC22.27@7635.83,1789.37 v1(7667.32,1789.37) ; IC22.31@7635.83,1868.11 v1(7667.32,1868.11) ; IC22.34@7635.83,1927.17 v1(7667.32,1927.17) ; C59.1@7710.63,952.76 v1(7736.22,952.76) ; C54.1@7730.32,1862.2 v1(7730.32,1840.16) v1@7732.28,1842.13 ; v1(7795.28,881.89) C48.1@7795.28,911.42 ; D6.1@7872.05,572.83 v1(7907.48,572.83) ; v1(7893.7,1086.61) IC29.2@7893.7,1125.98 ; v1(8004.13,677.36) IC26.4@8004.13,724.41 ; 7170.28,-5.91 7191.93,-5.91 ; 7191.93,-5.91 7217.52,-5.91
  TopLayer w11.81: IC11.6@4950.14,1515.94 4974.89,1515.94 C28.1@5004.06,1486.78
  TopLayer w15.75: v1(4545.59,1054.36) 4572.08,1054.36 C7.2@4586.79,1069.07
  TopLayer w19.68: C29.1@4776.84,1488.29 C29.1@4781.57,1483.56 ; v1(4802.47,2634.85) 4802.47,2658.79 4813.3,2669.61 C129.1@4816.2,2669.61 ; v1(4833.84,2636) C129.1@4833.84,2659.93 ; R34.1@4991.89,1951.61 R34.1@4993.46,1953.18 ; v1(4994.59,1454.98) 4994.59,1477.31 5012.27,1494.98 v1(5035.56,1494.98) ; v4@5047.39,1953.18 v4(5050.72,1956.52) 5050.81,1956.6 5092.86,1956.6 C25.1@5092.94,1956.68 5089.37,1960.25 v2(5089.37,2036.31) ; C17.1@5082.03,2166.04 5082.72,2165.35 5082.72,2103.49 5089.37,2096.84 v2(5089.37,2036.31) ; IC7.1@5142.52,2040.28 5093.34,2040.28 v2(5089.37,2036.31)
  TopLayer w20: IC4.1@4732.05,1718.04 4783.23,1718.04 v1(4785.2,1716.07)
  TopLayer w27.56: v4@4777.87,1427.9 v4(4777.87,1431.1) 4777.35,1431.62 4777.35,1482.39 4778.52,1483.56 C29.1@4781.57,1483.56
  TopLayer w30: v1(1831.71,401.8) 1839.71,409.8 L4_1.2@1889.35,409.81 ; v1(1831.71,677.39) 1839.71,685.39 L4_3.2@1889.35,685.4 ; v1(1831.71,952.98) 1839.71,960.99 L4_5.2@1889.35,960.99 ; v1(1831.71,1228.58) 1839.71,1236.58 L4_7.2@1889.35,1236.58 ; v1(1831.71,1504.17) 1839.71,1512.17 L4_10.2@1889.35,1512.17 ; v1(1831.71,1779.76) 1839.71,1787.76 L4_13.2@1889.35,1787.76 ; v1(1831.71,2055.35) 1839.71,2063.35 L4_16.2@1889.35,2063.35 ; v1(1831.71,2330.94) 1839.71,2338.94 L4_19.2@1889.35,2338.94 ; v1(1831.71,2606.53) 1839.71,2614.53 L4_22.2@1889.35,2614.53 ; v1(1831.71,2882.12) 1839.71,2890.12 L4_25.2@1889.35,2890.12 ; v1(1831.71,3157.71) 1839.71,3165.71 L4_28.2@1889.35,3165.71 ; v1(2808.09,303.38) 2816.09,311.38 L4_2.2@2865.73,311.38 ; v1(2808.09,578.97) 2816.09,586.97 L4_4.2@2865.73,586.97 ; v1(2808.09,854.56) 2816.09,862.56 L4_6.2@2865.73,862.56 ; v1(2808.09,1130.15) 2816.09,1138.15 L4_8.2@2865.73,1138.15 ; v1(2808.09,1405.74) 2816.09,1413.74 L4_11.2@2865.73,1413.74 ; v1(2808.09,1681.33) 2816.09,1689.33 L4_14.2@2865.73,1689.33 ; v1(2808.09,1956.92) 2816.09,1964.92 L4_17.2@2865.73,1964.92 ; v1(2808.09,2232.51) 2816.09,2240.51 L4_20.2@2865.73,2240.51 ; v1(2808.09,2508.1) 2816.09,2516.1 L4_23.2@2865.73,2516.1 ; v1(2808.09,2783.69) 2816.09,2791.69 L4_26.2@2865.73,2791.69 ; v1(2808.09,3059.28) 2816.09,3067.28 L4_29.2@2865.73,3067.28 ; v1(2808.09,3334.87) 2816.09,3342.87 L4_31.2@2865.73,3342.87 ; v1(3721.48,1139.99) 3729.48,1147.99 L4_9.2@3779.12,1147.99 ; v1(3721.48,1415.58) 3729.48,1423.58 L4_12.2@3779.12,1423.58 ; v1(3721.48,1691.17) 3729.48,1699.17 L4_15.2@3779.12,1699.17 ; v1(3721.48,1966.76) 3729.48,1974.76 L4_18.2@3779.12,1974.77 ; v1(3721.48,2242.35) 3729.48,2250.35 L4_21.2@3779.12,2250.36 ; v1(3721.48,2517.94) 3729.48,2525.95 L4_24.2@3779.12,2525.95 ; v1(3721.48,2793.54) 3729.48,2801.54 L4_27.2@3779.12,2801.54 ; v1(3721.48,3069.13) 3729.48,3077.13 L4_30.2@3779.12,3077.13 ; v1(3721.48,3344.72) 3729.48,3352.72 L4_32.2@3779.12,3352.72 ; v4(4537.17,1948.35) 4549.35,1936.17 4549.35,1926.93 4553.04,1923.24 4553.04,1907.76 4555.76,1905.05 R70.1@4557.73,1905.05 ; C1.1@4757.64,1637.33 4765.19,1629.78 4836.7,1629.78 4840.32,1633.39 ; C149.1@4784.7,2319.66 4802.07,2319.66 4838.84,2282.89 v2(4868.84,2282.89) v2(4898.84,2282.89) v2(4933.84,2282.89) 4938.84,2282.89 4983.84,2282.89 C151.1@4983.84,2417.89 ; C144.1@4840.32,1684.57 v1(4867.87,1657.02) ; IC27.6@4855.92,1231.11 4907.44,1231.11 C133.1@4928.26,1251.93 ; v1@4903.31,1637.33 4934.8,1637.33 C3.1@4938.74,1641.27 ; TP7.1@5143.51,1336.16 5145.02,1337.67 v1(5182.27,1337.67)
  Signal Layer 1 w15: 514.77,331.74 514.92,331.59 514.92,315.68 v1(515.81,314.78) ; 5068.23,3498.6 v1(5068.23,3521.05) ; v1(5412.68,3520.32) 5412.96,3520.05 5412.96,3498.53
  BottomLayer w5: C38.1@5711.23,407.38 5711.23,423.86 5731.51,444.15 v1(5731.51,451.19)
  BottomLayer w8: v1(385.22,-79.16) 404.86,-59.52 C76.1@468.27,-59.52 v1(497.72,-59.52) ; C71.1@468.27,-0.46 v1(497.72,-0.46) ; v1(676.93,166.86) 678.9,164.89 C77.1@678.9,127.49 ; C68.1@4556.85,755.57 v1(4592.28,755.57) ; C69.1@5427.86,803.89 5427.86,833.69 v3(5441.49,847.32) ; C22.1@5429.15,1327.61 5429.15,1361.89 v3(5431.09,1363.83) ; v3(5431.09,1481.94) 5433.15,1484 C23.1@5433.15,1511.17 ; C70.1@5434.15,1002.17 5441.49,994.83 v3(5441.49,965.43) ; v3(5549.2,1363.83) 5559.17,1353.87 5569.89,1353.87 C20.1@5579.15,1344.61 ; v3(5549.2,1422.89) 5562.2,1409.89 C19.1@5577.43,1409.89 ; v3(5549.2,1481.94) 5549.2,1494.23 C21.1@5579.15,1524.17
  BottomLayer w10: v1(-208.66,1366.14) -207.33,1364.81 -207.33,1326.45 LD3.1@-206,1325.12 ; LD1.1@-206,538.56 -205.36,539.2 -205.36,570.23 v1(-204.72,570.87) ; LD2.1@-206,753.56 -205.36,754.2 -205.36,790.7 v1(-204.72,791.34) ; LD4.1@-206,1540.47 -205.36,1541.11 -205.36,1574.17 v1(-204.72,1574.8) ; LD5.1@-206,2112.52 -205.36,2113.16 -205.36,2145.03 v1(-204.72,2145.67) ; LD6.1@-206,2327.87 -205.36,2328.51 -205.36,2361.57 v1(-204.72,2362.2) ; LD7.1@-206,2899.56 -205.36,2900.2 -205.36,2936.37 v1(-204.72,2937.01) ; LD8.1@-206,3115.43 -205.36,3116.07 -205.36,3148.97 v1(-204.72,3149.61) ; v1(-86.61,1937.01) C45.1@-86.61,1962.6 ; v1(-82.68,1437.01) -80.82,1435.15 -80.82,1428.27 -70.87,1418.31 IC17.8@-50.2,1418.31 ; C46.1@-5.91,1720.47 21.3,1720.47 44.46,1743.63 J13.SHELL1@45.04,1743.63 ; v1(6.95,803.55) 7.64,802.86 36.71,802.86 IC30.6@37.4,802.17 ; IC20.10@148.62,2307.09 v1(173.23,2307.09) ; v1(153.19,1174.8) v1@155.04,1176.66 ; C11.1@155.04,1193.43 C11.1@158.46,1196.85 ; IC21.8@179.13,1500 218.55,1500 224.52,1505.97 224.52,1523.74 v1(226.38,1525.59) IC21.7@179.13,1525.59 ; C60.1@274.1,852.63 275.59,851.13 v1(275.59,700.79) ; C91_1.1@1980,265.28 C90_1.2@2049.21,265.28 ; C91_3.1@1980,540.87 C90_3.2@2049.21,540.88 ; C91_5.1@1980,816.46 C90_5.2@2049.21,816.47 ; C91_7.1@1980,1092.06 C90_7.2@2049.21,1092.06 ; C91_10.1@1980,1367.65 C90_10.2@2049.21,1367.65 ; C91_13.1@1980,1643.24 C90_13.2@2049.21,1643.24 ; C91_16.1@1980,1918.83 C90_16.2@2049.21,1918.83 ; C91_19.1@1980,2194.42 C90_19.2@2049.21,2194.42 ; C91_22.1@1980,2470.01 C90_22.2@2049.21,2470.01 ; C91_25.1@1980,2745.6 C90_25.2@2049.21,2745.6 ; C91_28.1@1980,3021.19 2049.21,3021.19 2050,3021.98 C90_28.2@2050,3037.72 2094.09,3037.72 v1(2095.27,3038.91) ; C90_1.2@2050,281.82 2094.09,281.82 v1(2095.27,283) ; C90_3.2@2050,557.41 2094.09,557.41 v1(2095.27,558.59) ; C90_5.2@2050,833 2094.09,833 v1(2095.27,834.18) ; C90_7.2@2050,1108.59 2094.09,1108.59 v1(2095.27,1109.77) ; C90_10.2@2050,1384.18 2094.09,1384.18 v1(2095.27,1385.36) ; C90_13.2@2050,1659.77 2094.09,1659.77 v1(2095.27,1660.95) ; C90_16.2@2050,1935.36 2094.09,1935.36 v1(2095.27,1936.54) ; C90_19.2@2050,2210.95 2094.09,2210.95 v1(2095.27,2212.13) ; C90_22.2@2050,2486.54 2094.09,2486.54 v1(2095.27,2487.72) ; C90_25.2@2050,2762.13 2094.09,2762.13 v1(2095.27,2763.32) ; C92_1.1@2200,305.28 2227.72,305.28 v1(2250,283) ; C92_3.1@2200,580.87 2227.72,580.87 v1(2250,558.59) ; C92_5.1@2200,856.46 2227.72,856.46 v1(2250,834.18) ; C92_7.1@2200,1132.06 2227.72,1132.06 v1(2250,1109.77) ; C92_10.1@2200,1407.65 2227.72,1407.65 v1(2250,1385.36) ; C92_13.1@2200,1683.24 2227.72,1683.24 v1(2250,1660.95) ; C92_16.1@2200,1958.83 2227.72,1958.83 v1(2250,1936.54) ; C92_19.1@2200,2234.42 2227.72,2234.42 v1(2250,2212.13) ; C92_22.1@2200,2510.01 2227.72,2510.01 v1(2250,2487.72) ; C92_25.1@2200,2785.6 2227.72,2785.6 v1(2250,2763.32) ; C92_28.1@2200,3061.19 2227.72,3061.19 v1(2250,3038.91) ; v1(2280.29,362.82) 2310,392.53 2310,411.82 C93_1.1@2321.18,423 ; v1(2280.29,638.41) 2310,638.41 2310,687.41 C93_3.1@2321.18,698.59 ; v1(2280.29,914) 2310,914 2310,963 C93_5.1@2321.18,974.18 ; v1(2280.29,1189.59) 2310,1189.59 2310,1238.59 C93_7.1@2321.18,1249.77 ; v1(2280.29,1465.18) 2310,1465.18 2310,1514.18 C93_10.1@2321.18,1525.36 ; v1(2280.29,1740.77) 2310,1740.77 2310,1789.77 C93_13.1@2321.18,1800.95 ; v1(2280.29,2016.36) 2309.9,2016.36 2310,2016.46 2310,2065.36 C93_16.1@2321.18,2076.54 ; v1(2280.29,2291.95) 2310,2291.95 2310,2340.95 C93_19.1@2321.18,2352.13 ; v1(2280.29,2567.54) 2310,2567.54 2310,2616.54 C93_22.1@2321.18,2627.72 ; v1(2280.29,2843.13) 2310,2843.13 2310,2892.13 C93_25.1@2321.18,2903.32 ; v1(2280.29,3118.72) 2310,3118.72 2310,3167.72 C93_28.1@2321.18,3178.91 ; C91_2.1@2956.38,166.86 C90_2.2@3025.59,166.86 ; C91_4.1@2956.38,442.45 C90_4.2@3025.59,442.45 ; C91_6.1@2956.38,718.04 C90_6.2@3025.59,718.04 ; C91_8.1@2956.38,993.63 C90_8.2@3025.59,993.63 ; C91_11.1@2956.38,1269.22 C90_11.2@3025.59,1269.22 ; C91_14.1@2956.38,1544.81 C90_14.2@3025.59,1544.81 ; C91_17.1@2956.38,1820.4 C90_17.2@3025.59,1820.4 ; C91_20.1@2956.38,2095.99 C90_20.2@3025.59,2095.99 ; C91_23.1@2956.38,2371.58 C90_23.2@3025.59,2371.58 ; C91_26.1@2956.38,2647.17 C90_26.2@3025.59,2647.17 ; C91_29.1@2956.38,2922.76 C90_29.2@3025.59,2922.77 ; C91_31.1@2956.38,3198.35 C90_31.2@3025.59,3198.36 ; C90_2.2@3026.38,183.39 3070.47,183.39 v1(3071.65,184.57) ; C90_4.2@3026.38,458.98 3070.47,458.98 v1(3071.65,460.17) ; C90_6.2@3026.38,734.57 3070.47,734.57 v1(3071.65,735.76) ; C90_8.2@3026.38,1010.17 3070.47,1010.16 v1(3071.65,1011.35) ; C90_11.2@3026.38,1285.76 3070.47,1285.76 v1(3071.65,1286.94) ; C90_14.2@3026.38,1561.35 3070.47,1561.35 v1(3071.65,1562.53) ; C90_17.2@3026.38,1836.94 3070.47,1836.94 v1(3071.65,1838.12) ; C90_20.2@3026.38,2112.53 3070.47,2112.53 v1(3071.65,2113.71) ; C90_23.2@3026.38,2388.12 3070.47,2388.12 v1(3071.65,2389.3) ; C90_26.2@3026.38,2663.71 3070.47,2663.71 v1(3071.65,2664.89) ; C90_29.2@3026.38,2939.3 3070.47,2939.3 v1(3071.65,2940.48) ; C90_31.2@3026.38,3214.89 3070.47,3214.89 v1(3071.65,3216.07) ; C92_2.1@3176.38,206.86 3204.09,206.86 v1(3226.38,184.57) ; C92_4.1@3176.38,482.45 3204.09,482.45 v1(3226.38,460.17) ; C92_6.1@3176.38,758.04 3204.09,758.04 v1(3226.38,735.76) ; C92_8.1@3176.38,1033.63 3204.09,1033.63 v1(3226.38,1011.35) ; C92_11.1@3176.38,1309.22 3204.09,1309.22 v1(3226.38,1286.94) ; C92_14.1@3176.38,1584.81 3204.09,1584.81 v1(3226.38,1562.53) ; C92_17.1@3176.38,1860.4 3204.09,1860.4 v1(3226.38,1838.12) ; C92_20.1@3176.38,2135.99 3204.09,2135.99 v1(3226.38,2113.71) ; C92_23.1@3176.38,2411.58 3204.09,2411.58 v1(3226.38,2389.3) ; C92_26.1@3176.38,2687.18 3204.09,2687.17 v1(3226.38,2664.89) ; C92_29.1@3176.38,2962.76 3204.09,2962.76 v1(3226.38,2940.48) ; C92_31.1@3176.38,3238.36 3204.09,3238.35 v1(3226.38,3216.07) ; v1(3256.67,264.39) 3286.38,294.1 3286.38,313.39 C93_2.1@3297.56,324.57 ; v1(3256.67,539.98) 3280.61,539.98 3286.38,545.75 3286.38,588.98 C93_4.1@3297.56,600.17 ; v1(3256.67,815.58) 3280.61,815.58 3286.38,821.35 3286.38,864.57 C93_6.1@3297.56,875.76 ; v1(3256.67,1091.17) 3280.61,1091.17 3286.38,1096.94 3286.38,1140.16 C93_8.1@3297.56,1151.35 ; v1(3256.67,1366.76) 3264.1,1374.18 3286.38,1374.18 3286.38,1415.76 C93_11.1@3297.56,1426.94 ; v1(3256.67,1642.35) 3280.61,1642.35 3286.38,1648.12 3286.38,1691.35 C93_14.1@3297.56,1702.53 ; v1(3256.67,1917.94) 3280.61,1917.94 3286.38,1923.71 3286.38,1966.94 C93_17.1@3297.56,1978.12 ; v1(3256.67,2193.53) 3284.54,2193.53 3286.38,2195.36 3286.38,2242.53 C93_20.1@3297.56,2253.71 ; v1(3256.67,2469.12) 3279.84,2469.12 3286.38,2475.66 3286.38,2518.12 C93_23.1@3297.56,2529.3 ; v1(3256.67,2744.71) 3280.61,2744.71 3286.38,2750.48 3286.38,2793.71 C93_26.1@3297.56,2804.89 ; v1(3256.67,3020.3) 3278.27,3020.3 3286.38,3028.41 3286.38,3069.3 C93_29.1@3297.56,3080.48 ; v1(3256.67,3295.89) 3280.61,3295.89 3286.38,3301.66 3286.38,3344.89 C93_31.1@3297.56,3356.07 ; R74.2@3275.59,-28.54 v1(3275.59,39.37) ; v1(3438.74,314.5) C81.1@3478.11,314.5 ; C82.1@3450.55,-43.77 3481.85,-12.47 IC3.4@3481.85,27.09 3481.85,74.14 v1(3482.05,74.34) ; C79.2@3505.97,520.31 3544.9,520.31 3546,519.22 v1(3580.47,519.22) 3584.25,515.44 3601.97,515.44 3606.06,511.35 IC5.25@3643.76,511.35 IC18.25@3690.02,511.35 ; v1(3548.94,710.76) 3549.51,710.19 C47.2@3590.31,710.19 3629.05,710.19 3659.21,740.35 v1(3659.21,754.94) 3677.27,754.94 3690.1,767.77 ; v1(3562.41,437.79) 3565.09,437.79 3565.09,416.14 C78.1@3570.28,410.95 ; v1(3576.54,326.31) C53.1@3602.13,326.31 ; C80.1@3667.09,-43.77 3698.58,-43.77 v1(3702.52,-39.83) ; C4.1@3682.55,792.16 3682.55,775.32 3690.1,767.77 ; v1(3726.14,208.2) C31.1@3726.14,233.79 ; IC18.34@3737.26,676.7 3737.26,745.56 3735.87,745.56 3716.79,764.65 3716.79,767.77 3690.1,767.77 ; v1(3757.63,826.31) C50.1@3777.01,826.31 ; C91_9.1@3869.76,1003.47 C90_9.2@3938.98,1003.47 ; C91_12.1@3869.76,1279.06 C90_12.2@3938.98,1279.06 ; C91_15.1@3869.76,1554.65 C90_15.2@3938.98,1554.65 ; C91_18.1@3869.76,1830.25 C90_18.2@3938.98,1830.25 ; C91_21.1@3869.76,2105.84 C90_21.2@3938.98,2105.84 ; C91_24.1@3869.76,2381.42 C90_24.2@3938.98,2381.43 ; C91_27.1@3869.76,2657.01 C90_27.2@3938.98,2657.02 ; C91_30.1@3869.76,2932.61 C90_30.2@3938.98,2932.61 ; C91_32.1@3869.76,3208.2 C90_32.2@3938.98,3208.2 ; C9.1@3882.32,825.57 3898.48,841.72 v6(3898.48,857.75) ; C90_9.2@3939.76,1020.01 3983.86,1020.01 v1(3985.04,1021.19) ; C90_12.2@3939.76,1295.6 3983.86,1295.6 v1(3985.04,1296.78) ; C90_15.2@3939.76,1571.19 3983.86,1571.19 v1(3985.04,1572.37) ; C90_18.2@3939.76,1846.78 3983.86,1846.78 v1(3985.04,1847.96) ; C90_21.2@3939.76,2122.37 3983.86,2122.37 v1(3985.04,2123.55) ; C90_24.2@3939.76,2397.96 3983.86,2397.96 v1(3985.04,2399.14) ; C90_27.2@3939.76,2673.55 3983.86,2673.55 v1(3985.04,2674.73) ; C90_30.2@3939.76,2949.14 3983.86,2949.14 v1(3985.04,2950.32) ; C90_32.2@3939.76,3224.73 3983.86,3224.73 v1(3985.04,3225.91) ; v6(3946.97,237.61) 3953.64,244.28 3953.64,279.89 IC5.4@3953.8,280.05 IC18.4@3953.8,326.31 ; IC18.46@3973.48,676.7 IC5.46@3973.48,722.96 3973.48,753.06 3987.99,767.57 3992.05,767.57 4000.83,776.35 4011.54,776.35 4027.04,791.85 v1(4028.28,791.85) 4055.22,791.85 C12.2@4074.33,810.96 ; IC18.59@4040.41,452.29 IC5.59@4086.67,452.29 4125.75,452.29 C83.1@4139.53,466.07 ; IC18.58@4040.41,471.98 IC5.58@4086.67,471.98 4133.62,471.98 C83.1@4139.53,466.07 ; IC18.51@4040.41,609.77 4040.57,609.61 IC5.51@4086.49,609.61 ; v1(4074.59,845.99) 4076.54,844.04 C12.2@4076.54,810.96 ; IC5.51@4086.67,609.77 4118.29,609.77 4147.06,638.54 4147.06,648.52 v1(4141.73,653.85) ; C92_9.1@4089.77,1043.47 4117.48,1043.47 v1(4139.76,1021.19) ; C92_12.1@4089.76,1319.06 4117.48,1319.06 v1(4139.76,1296.78) ; C92_15.1@4089.76,1594.65 4117.48,1594.65 v1(4139.76,1572.37) ; C92_18.1@4089.77,1870.24 4117.48,1870.24 v1(4139.76,1847.96) ; C92_21.1@4089.77,2145.84 4117.48,2145.83 v1(4139.76,2123.55) ; C92_24.1@4089.76,2421.43 4117.48,2421.43 v1(4139.76,2399.14) ; C92_27.1@4089.76,2697.02 4117.48,2697.02 v1(4139.76,2674.73) ; C92_30.1@4089.77,2972.61 4117.48,2972.61 v1(4139.76,2950.32) ; C92_32.1@4089.76,3248.2 4117.48,3248.2 v1(4139.76,3225.91) ; v1(4158.58,439.42) 4158.58,454.54 4147.06,466.07 C83.1@4139.53,466.07 ; v1(4170.06,1101.01) 4199.76,1130.71 4199.76,1150.01 C93_9.1@4210.94,1161.19 ; v1(4170.06,1376.6) 4199.76,1376.6 4199.76,1425.6 C93_12.1@4210.94,1436.78 ; v1(4170.06,1652.19) 4199.76,1652.19 4199.76,1701.19 C93_15.1@4210.94,1712.37 ; v1(4170.06,1927.78) 4199.76,1927.78 4199.76,1976.78 C93_18.1@4210.94,1987.96 ; v1(4170.06,2203.37) 4199.76,2203.37 4199.76,2252.37 C93_21.1@4210.94,2263.55 ; v1(4170.06,2478.96) 4199.76,2478.96 4199.76,2527.96 C93_24.1@4210.94,2539.14 ; v1(4170.06,2754.55) 4199.76,2754.55 4199.76,2803.55 C93_27.1@4210.94,2814.73 ; v1(4170.06,3030.14) 4199.76,3030.14 4199.76,3079.14 C93_30.1@4210.94,3090.32 ; v1(4170.06,3305.73) 4199.76,3305.73 4199.76,3354.73 C93_32.1@4210.94,3365.91 ; C14.2@4182.84,790.87 v1(4222.2,790.87) ; C95.1@4548.98,696.39 v1(4596.22,696.39) ; C147.1@4650.3,1816.23 4656.97,1822.89 v1(4703.84,1822.89) ; C36.1@4962.3,1245.33 4969.31,1252.34 v1(4969.31,1277.05) ; C37.1@4995.81,1522.38 C35.1@5034.99,1522.38 ; C35.1@5034.99,1520.38 C35.1@5035.28,1520.09 ; v1(5035.56,1494.98) v1@5035.28,1495.27 ; C35.1@5037.53,1517.83 C35.1@5035.28,1520.09 ; R40.1@5062.54,1717.11 R40.1@5067.07,1712.58 ; v1(5081.44,2800.68) C10.2@5130.66,2800.68 v1(5189.71,2800.68) ; IC13.2@5088.78,1612.96 5089.14,1613.31 5121.77,1613.31 v1(5122.13,1613.67) ; C100.1@6108.73,421.72 6108.73,512.27 C42.1@6141.73,545.28 ; C42.1@6142.07,545.61 v1(6142.07,579.63) ; C103.1@6247.8,627.51 v1(6270.13,627.51) ; v1(6340.03,572.31) IC24.1@6423.76,572.31 6425.51,572.31 IC24.1@6432.33,579.12 ; C41.1@6525.19,521.09 6525.04,521.24 R229.1@6525.04,471.55 6525.04,470.76 6546.46,449.35 v1(6547.24,449.35) ; C43.1@6886.48,565.85 v1(6908.7,565.85) ; IC16.7@7073.34,356.6 v1(7120.73,356.6) ; v1@5035.28,1495.27 5034.88,1495.67 v1@5035.28,1496.07 ; v1@5035.28,1495.27 v1@5035.28,1496.07 ; v1@5035.28,1496.07 C35.1@5035.28,1520.09
  BottomLayer w15: v1@155.04,1176.66 C11.1@155.04,1193.43 ; v1(5032.89,1717.11) R40.1@5062.54,1717.11
  BottomLayer w19.68: v1(4714.34,3322.86) 4714.94,3322.86 4746.81,3354.73 C2.1@4757.64,3354.73 4772.06,3340.31 v1(4772.06,3315.55) ; C142.1@4722.21,3443.31 4722.21,3489.21 v1(4723,3490) ; C63.1@4777.87,1382.36 C63.1@4781.57,1378.66 ; v2(5021.38,2194.12) 5021.38,2235.33 C18.1@5022.43,2236.38 ; v4(5050.72,1956.52) 5050.89,1956.68 C26.1@5092.94,1956.68 ; IC10.4@5327.01,553.87 v1(5372.29,553.87)
  BottomLayer w20: C124.2@4699.07,1373.8 4699.07,1384.62 4745.55,1431.1 v4(4777.87,1431.1)
  BottomLayer w27.56: C63.1@4777.87,1382.36 v4(4777.87,1431.1)
  BottomLayer w30: C62_3.1@1760.1,665.13 C62_3.1@1773.39,665.13 ; C62_10.1@1760.1,1491.91 1819.45,1491.91 v1(1831.71,1504.17) ; C62_22.1@1760.1,2594.27 1772.36,2606.53 v1(1831.71,2606.53) ; C62_25.1@1760.1,2869.86 1819.45,2869.86 v1(1831.71,2882.12) ; C62_28.1@1760.1,3145.45 1819.45,3145.45 v1(1831.71,3157.71) ; C62_1.1@1761.57,401.11 1831.02,401.11 v1(1831.71,401.8) ; C62_7.1@1761.57,1227.88 1831.02,1227.88 v1(1831.71,1228.58) ; C62_13.1@1765.51,1783 1768.76,1779.76 v1(1831.71,1779.76) ; C62_5.1@1772.36,952.98 v1(1831.71,952.98) ; C62_16.1@1772.36,2055.35 v1(1831.71,2055.35) ; C62_19.1@1772.36,2330.94 v1(1831.71,2330.94) ; C62_3.1@1773.39,676.7 1831.02,676.7 v1(1831.71,677.39) ; C62_23.1@2730.08,2503.47 2803.46,2503.47 v1(2808.09,2508.1) ; C62_4.1@2732.05,580.24 2733.32,578.97 v1(2808.09,578.97) ; C62_26.1@2734.02,2779.06 2803.46,2779.06 v1(2808.09,2783.69) ; C62_8.1@2736.35,1129.46 2807.4,1129.46 v1(2808.09,1130.15) ; C62_6.1@2736.48,842.3 C62_6.1@2745.83,842.3 ; C62_17.1@2736.48,1944.66 C62_17.1@2737.95,1944.66 ; C62_20.1@2736.48,2220.25 C62_20.1@2741.89,2220.25 ; C62_2.1@2737.95,302.69 2738.65,303.38 v1(2808.09,303.38) ; C62_17.1@2737.95,1952.29 2803.46,1952.29 v1(2808.09,1956.92) ; C62_20.1@2741.89,2224.98 2800.56,2224.98 v1(2808.09,2232.51) ; C62_29.1@2741.89,3058.59 2807.4,3058.59 v1(2808.09,3059.28) ; C62_6.1@2745.83,849.93 2803.46,849.93 v1(2808.09,854.56) ; C62_11.1@2748.74,1405.74 v1(2808.09,1405.74) ; C62_14.1@2748.74,1681.33 v1(2808.09,1681.33) ; C62_31.1@2753.7,3334.18 2807.4,3334.18 v1(2808.09,3334.87) ; C62_9.1@3649.86,1127.73 C62_9.1@3658.84,1127.73 ; C62_18.1@3649.86,1954.5 C62_18.1@3658.84,1954.5 ; C62_30.1@3649.86,3056.87 3709.22,3056.87 v1(3721.48,3069.13) ; C62_32.1@3649.86,3332.46 3709.22,3332.46 v1(3721.48,3344.72) ; C62_12.1@3651.34,1416.86 3720.2,1416.86 v1(3721.48,1415.58) ; C62_27.1@3651.34,2794.81 3720.2,2794.81 v1(3721.48,2793.54) ; C62_9.1@3658.84,1137.33 3718.82,1137.33 v1(3721.48,1139.99) ; C62_18.1@3658.84,1960.17 3714.88,1960.17 v1(3721.48,1966.76) ; C62_24.1@3658.84,2523.16 3716.27,2523.16 v1(3721.48,2517.94) ; C62_15.1@3659.21,1688.51 3718.82,1688.51 v1(3721.48,1691.17) ; C62_21.1@3662.12,2242.35 v1(3721.48,2242.35) ; v1(4710.13,2960) 4718.42,2968.28 4773.05,2968.28 C134.2@4782.66,2977.89 ; v1(5043.84,2917.89) 5044.27,2918.32 C131.1@5044.27,2972.89 ; C132.2@5080.02,3057.89 v1(5133.84,3057.89) ; C137.1@5392.69,2135.01 v1(5431.72,2135.01) ; C140.1@5392.69,2213.75 v1(5432.98,2213.75) ; C139.1@5392.69,2292.49 v1(5438.44,2292.49) ; C138.1@5392.69,2371.23 5435.5,2371.23 v1(5438.84,2367.89) ; C136.2@5428.12,2469.65 v1(5482.08,2469.65) ; v1(5693.84,202.89) 5693.84,245.54 IC32.2@5694.51,246.2
  BottomLayer w40: C130.1@5425.43,3053 C141.1@5644.57,3053 5644.57,3141.98 IC1.5@5633.54,3153
  other v1: 3454.48,420.79 6327.23,812.01 6327.23,896.65 6327.76,965.02 6327.76,1049.67 6327.76,1124.47 4731.23,1205.91 6327.76,1209.11 6224.41,1279.53 6306.1,1290.81 6326.77,1404.98 5091.26,1487.34 6326.77,1489.63 6326.77,1590.02 4804.65,1629.78 4903.5,1637.92 6326.77,1674.67 6326.77,1709.11 6326.77,1793.76 6327.76,1885.3 5673.55,1908.52 6327.76,1969.94 5733.54,2013 5475.98,2136.6 6048.66,2826.66 4583.84,2969.5 6048.66,3277.66 5850.5,3422.26 4674.96,3548.16
  other v2: 5088.93,2096.21
  other v3: 5559.6,847.32 5559.6,906.37 7417.32,905.57 7535.43,905.57 5559.6,965.43 7476.38,964.63 7417.32,1023.69 7535.43,1023.69 5431.09,1422.89 7440.94,1803.21 7559.06,1803.21 7500,1862.27 7440.94,1921.32 7559.06,1921.32
I2C_EEM1_SCL: D6.3 IC26.6 IC29.1 J6.27 TP20.1 | length 2022.2
  TopLayer w5: J6.27@6600.79,675.59 6645.67,720.47 7011.81,720.47 7066.93,665.35 v1(7669.29,665.35) ; v1(7744.09,641.73) 7779.53,641.73 D6.3@7781.5,639.76 ; IC29.1@7931.1,1125.98 7931.1,1080.71 7954.13,1057.68 IC26.6@7954.13,937.01 7944.82,927.7 7944.82,897.58 7848.43,801.18 7781.5,734.25 D6.3@7781.5,639.76 ; TP20.1@7988.19,602.36 7826.77,602.36 7789.37,639.76 D6.3@7781.5,639.76
  BottomLayer w5: v1(7669.29,665.35) 7720.47,665.35 v1(7744.09,641.73)